# Altium PCB RemoteSensorUnit-v1.0.PcbDoc (part 4 of 5)
Units mm, origin at the board's own origin, x right, y up, seen from the top; angles counter-clockwise.
Board outline 80 x 114 mm, 2 copper layers (Top Layer, Bottom Layer), stack 1.448 mm thick; 163 components, 122 nets, 631 pads, 300 vias.
Unrouted connection lines stored in the file: 147.
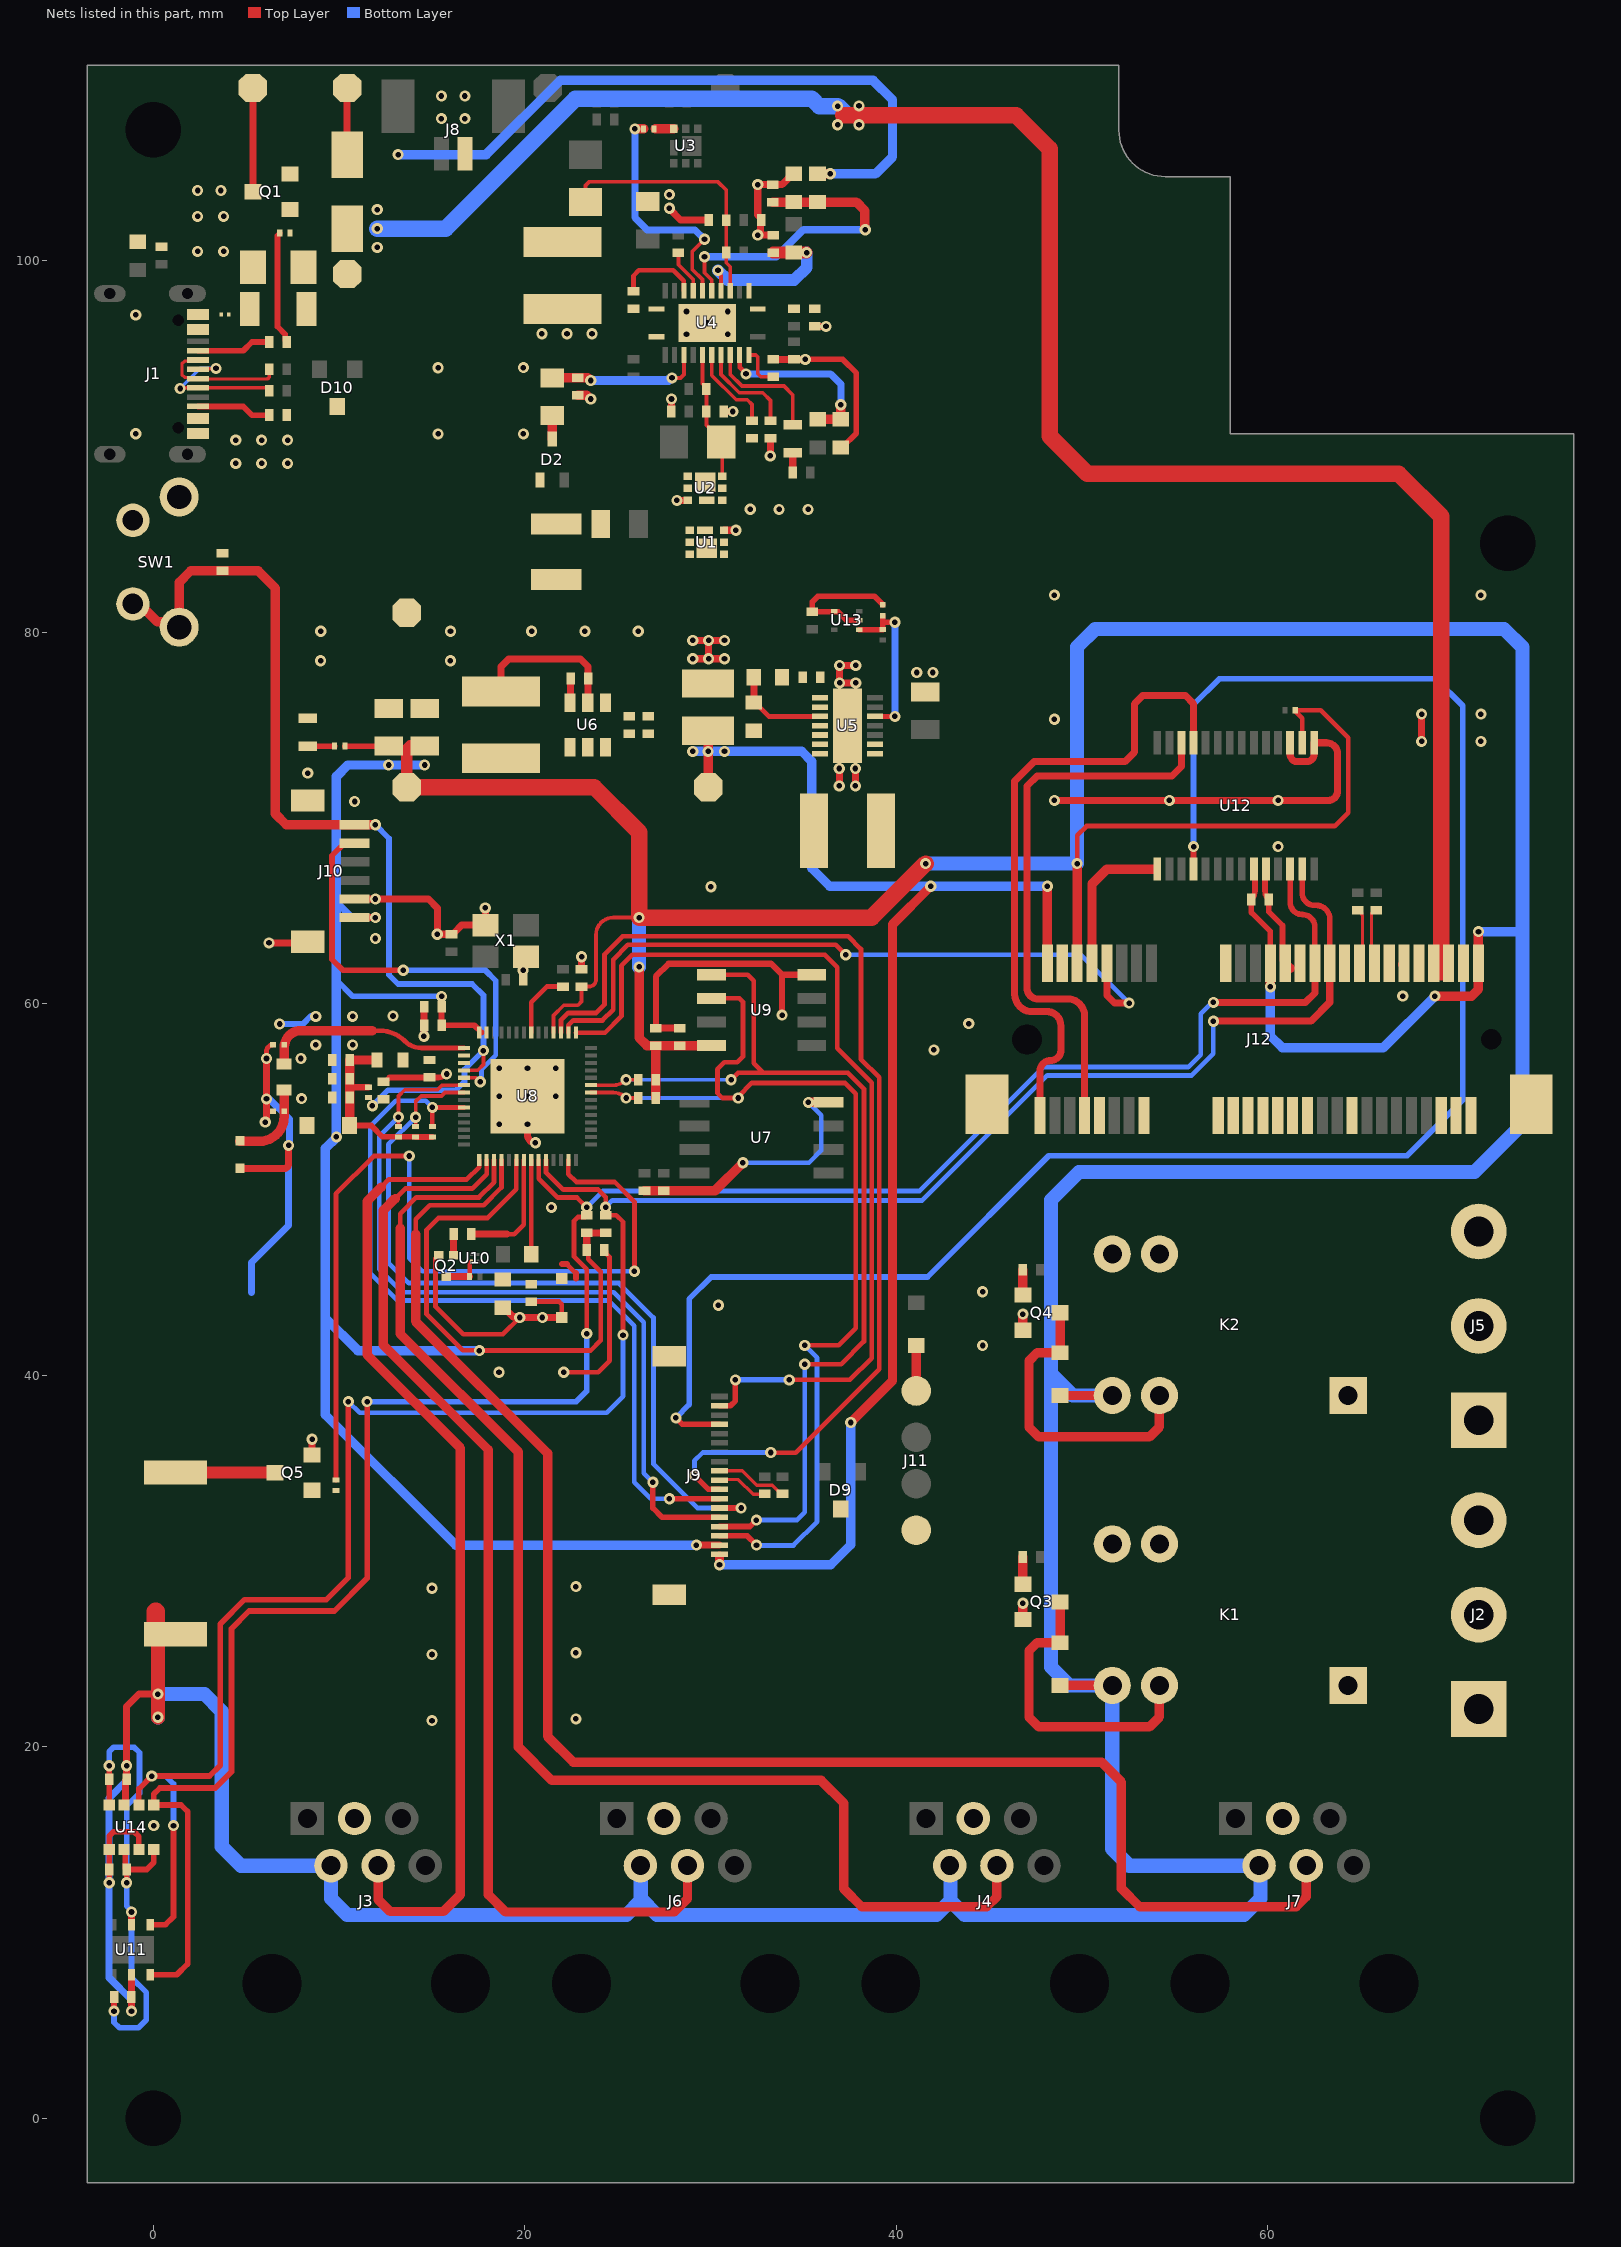
[diagram p2: the nets of this part, all layers, seen from the top]

## Via types
v1: diameter 0.6, hole 0.3, Top Layer to Bottom Layer, 300 vias

## Nets (pads, with @x,y where several pads share a name; then routed paths per layer and width w, separated by ;. In a path a pad name is that pad's centre, name@x,y a point inside that pad or via, vN(x,y) a via of type N, cw(c..) or ccw(c..) an arc to the next point about the centre after c; other vN are vias at no path point) (continued)
BUZZER: (continued)
  Top Layer w0.254: R44.1@9.839,34.355 9.839,49.771 11.868,51.8 v1(13.787,51.8) ; U8.27@22.352,51.59 22.352,50.831 22.779,50.404 24.835,50.404 25.908,49.331 v1(25.908,45.596)
  Bottom Layer w0.254: v1(13.787,51.8) 13.787,46.3 14.491,45.596 v1(25.908,45.596)
CMSRC: R15.1 U1.4 U1.7 U2.4 U2.7
  other v1: 32.139,86.617 33.698,86.613 35.256,86.609
D/C: J9.4 U12.4 | length 101
  Top Layer w0.305: v1(28.137,37.702) 28.487,37.352 J9.4@30.488,37.352 ; U12.4@56.007,67.247 v1(56.007,68.456)
  Bottom Layer w0.305: v1(28.137,37.702) 28.854,38.42 28.854,44.094 30.046,45.286 41.689,45.286 48.216,51.813 67.504,51.813 70.5,54.809 70.5,76.039 69.051,77.488 57.389,77.488 56.007,76.106 v1(56.007,68.456)
DCDC_POK: J12.8 U12.1 | length 8.1
  Top Layer w0.508: J12.8@50.541,62.178 50.541,66.447 51.341,67.247 U12.1@54.004,67.247
EN: C37.2 C38.2 J10.6 R29.1 SW1.2 SW1.3 U8.4 | length 55.4
  Top Layer w0.203: U8.4@16.727,56.415 17.469,56.415 17.78,56.726 v1(17.78,57.475)
  Top Layer w0.508: SW1.2@-1.089,81.522 -0.739,81.522 0.211,80.572 1.097,80.572 SW1.3@1.401,80.267 1.401,82.68 2.024,83.303 C38.2@3.738,83.303 5.646,83.303 6.579,82.369 6.579,70.221 7.164,69.636 v1(11.963,69.636)
  Bottom Layer w0.305: v1(11.8,54.509) 12.641,55.35 16.307,55.35 16.762,55.804 16.762,56.456 v1(17.78,57.475) 17.78,60.456 17.172,61.065 13.185,61.065 12.699,61.551 12.699,68.901 v1(11.963,69.636)
GATE_DRIVER: R16.1 U1.3 U2.3 | length 2.2
  Top Layer w0.381: v1(28.192,87.096) U2.3@28.788,87.096 ; U1.3@30.729,85.489 v1(31.368,85.489) ; v1(33.223,89.487) 33.228,89.492 33.228,90.442 R16.1@33.232,90.447
GND: ANT1.GND C1.1 C3.2 C4.2 C8.2 C10.2 C12.2 C15.1 C16.1 C18.1 C19.1 C20.2 C22.1 C23.1 C24.1 C25.1 C26.1 C27.1 C28.1 C29.1 C30.1 C31.1 C32.1 C33.1 C34.1 C35.1 C36.1 C37.1 C38.1 C39.1 C40.1 C41.1 C42.2 C43.2 C44.2 C45.1 C46.2 C47.1 C48.2 C49.1 C50.1 C51.1 D1.2 D5.2 D6.1 D9.3 D10.3 J1.A1/B12 J1.B1/A12 J3.3 J4.3 J6.3 J7.3 J8.1 J9.MP1 J9.MP2 J10.2 J10.MP1 J10.MP2 J11.4 J12.4 J12.9 J12.15 J12.17 J12.18 J12.19 J12.21 J12.23 J12.25 J12.26 J12.27 J12.28 J12.29 J12.34 J12.35 J12.40 J12.42 J12.44 J12.47 J12.49 J12.50 J12.51 J12.53 J12.54 LED2.2 P6.1 Q2.2 Q3.2 Q4.2 Q5.2 R1.2 R2.2 R5.2 R9.1 R10.1 R18.1 R20.1 R22.1 R24.1 R40.2 R48.1 SW1.1 SW1.4 U4.14 U4.25 U5.2 U5.15 U6.4 U7.4 U8.57 U9.4 U11.2 U12.10 U12.15 U12.17 U13.2 U13.4 U14.1 U14.5 U14.7 X1.2 X1.4 | length 199.2
  Top Layer w0.254: v1(6.1,57.051) 6.1,57.432 cw(c6.452,57.432) C51.1@6.452,57.784 ; Q2.2@15.249,46.362 15.347,46.46 Q2.2@15.372,46.46 15.204,46.291 15.204,43.687 16.689,42.201 18.83,42.201 v1(19.736,43.107) ; C42.2@20.352,43.966 21.847,43.966 21.996,43.817 D6.1@21.996,43.106 ; v1(22.099,40.157) 23.953,40.157 24.57,40.774 24.57,46.361 C39.1@24.357,46.574 ; 22.272,45.977 22.759,45.49
  Top Layer w0.305: U14.1@-2.368,16.866 C47.1@-2.368,18.252 v1(-2.368,18.977) ; v1(-2.108,5.769) C48.2@-2.108,6.531 ; U14.7@-1.568,14.466 -1.498,14.396 -1.498,13.459 C46.2@-1.429,13.389 ; v1(-1.429,12.678) C46.2@-1.429,13.389 ; U14.5@0.032,14.466 0.032,13.768 -0.348,13.389 C46.2@-1.429,13.389 ; R22.1@6.814,101.482 6.814,101.466 6.695,101.347 6.695,96.449 7.112,96.032 7.112,95.7 R1.2@7.188,95.624 ; C37.1@12.403,55.803 12.492,55.803 12.718,56.029 C32.1@14.867,56.029 15.348,56.029 ccw(c15.348,56.666) v1(15.799,56.216) ; C39.1@24.281,46.739 24.357,46.663 C39.1@24.357,46.574 ; R18.1@33.356,104.097 R18.1@33.37,104.111 ; C49.1@34.433,104.681 C49.1@34.496,104.681 ; v1(35.102,94.688) 37.119,94.688 37.854,93.953 37.854,90.712 37.082,89.94 R20.1@37.018,89.94 ; U13.2@38.016,80.636 37.341,80.636 36.871,81.106 C44.2@35.479,81.106 35.479,81.633 35.781,81.935 38.827,81.935 C45.1@39.279,81.483 ; U12.10@59.907,67.247 59.853,67.193 59.853,66.088 ccw(c60.498,66.088) C43.2@60.042,65.632 ; C43.2@60.063,65.612 60.063,64.942 60.794,64.211 60.794,62.326 J12.26@60.941,62.178
  Top Layer w0.33: J10.MP1@8.318,63.336 J10.MP1@8.56,63.093 ; 22.01,45.977 22.272,45.977 ; 22.759,45.217 22.759,45.49 ; C34.1@27.061,58.687 27.061,61.467 27.744,62.15 33.266,62.15 33.858,61.557 ; v1(33.858,59.388) 33.858,61.557 ; U9.4@35.455,61.557 33.858,61.557
  Top Layer w0.381: U11.2@-1.168,10.421 v1(-1.168,11.103) ; ANT1.GND@4.669,51.137 5.105,51.137 5.105,51.13 7.036,51.13 ccw(c7.036,51.384) 7.291,51.384 v1(7.291,52.374) ; v1(6.03,53.624) 6.071,53.666 6.071,53.821 6.1,53.849 v1(6.1,54.876) v1(6.1,57.051) ; v1(6.236,63.274) 8.379,63.274 J10.MP1@8.56,63.093 ; Q5.2@8.553,35.705 v1(8.553,36.554) ; J10.2@10.843,65.636 14.814,65.636 15.296,65.154 v1(15.296,63.739) C40.1@16.063,63.739 16.152,63.739 16.19,63.777 16.19,63.811 16.609,64.23 X1.4@17.88,64.23 v1(17.88,65.154) ; v1(14.577,58.249) 14.581,58.253 14.581,58.834 C27.1@14.584,58.837 C28.1@14.584,59.837 ; R40.2@18.828,43.635 18.891,43.635 19.378,43.149 19.694,43.149 v1(19.736,43.107) ; v1(19.736,43.107) 20.954,43.106 D6.1@21.996,43.106 ; C41.1@19.92,61.293 19.918,61.295 19.918,61.797 v1(19.916,61.799) 19.916,62.366 X1.2@20.08,62.53 ; v1(20.152,53.505) 20.152,52.935 ccw(c20.574,52.935) v1(20.574,52.513) ; C26.1@23.063,61.865 v1(23.063,62.53) ; C34.1@27.061,58.687 C33.1@28.345,58.687 ; v1(27.788,102.822) 27.788,102.797 28.397,102.187 C10.2@29.909,102.187 ; C4.2@27.902,91.88 v1(27.902,92.553) ; v1(29.049,78.57) v1(29.903,78.57) ; v1(29.049,79.561) v1(29.903,79.561) ; C3.2@30.721,91.88 v1(31.21,91.88) ; v1(30.757,78.57) v1(29.903,78.57) ; v1(30.757,79.561) v1(29.903,79.561) ; C12.2@32.717,102.199 32.717,102.287 32.545,102.459 v1(32.545,104.097) R18.1@33.356,104.097 ; C12.2@32.728,102.187 32.69,102.149 32.69,101.583 32.545,101.438 v1(32.545,101.379) R9.1@33.379,101.379 ; R18.1@33.37,104.111 33.862,104.111 C49.1@34.433,104.681 ; C15.1@33.379,94.688 C16.1@34.496,94.688 v1(35.102,94.688) ; R10.1@35.614,96.463 v1(36.22,96.463) ; v1(36.937,71.724) v1(36.937,72.663) ; v1(37.801,71.724) v1(37.801,72.663) ; v1(37.821,77.27) v1(36.957,77.27) v1(36.957,78.21) v1(37.821,78.21) ; v1(48.514,70.945) 63.271,70.945 ccw(c63.271,71.428) 63.754,71.428 63.754,73.468 ccw(c63.175,73.468) 63.175,74.047 U12.15@62.507,74.047 62.507,73.468 cw(c62.067,73.468) 62.067,73.028 61.601,73.028 cw(c61.601,73.422) 61.207,73.422 U12.17@61.207,74.047 ; v1(68.286,74.12) v1(68.286,75.593) ; v1(29.903,78.57) v1(29.903,79.561)
  Top Layer w0.508: C8.2@22.86,92.751 23.33,92.751 23.528,92.553 v1(23.553,92.553) ; C35.1@26.45,49.94 C36.1@27.491,49.94 30.252,49.94 v1(31.75,51.438) ; v1(35.27,54.69) U7.4@36.36,54.69 ; Q3.2@46.823,26.845 v1@46.823,27.721 ; Q4.2@46.823,42.415 v1@46.823,43.291 ; J12.26@60.941,62.178 J12.26@61.207,61.912 ; J12.42@67.273,62.11 J12.42@67.341,62.178
  Bottom Layer w0.254: v1(31.75,51.438) 35.306,51.438 35.966,52.098 35.966,53.994 v1(35.27,54.69)
  Bottom Layer w0.305: v1(-2.368,18.977) -2.368,19.735 -2.134,19.97 -1.025,19.97 -0.737,19.681 -0.737,17.504 -1.429,16.812 v1(-1.429,12.678) -1.429,11.429 -1.168,11.169 v1(-1.168,11.103) -1.168,7.563 -0.369,6.764 -0.369,5.3 -0.8,4.869 -1.815,4.869 -2.108,5.162 v1(-2.108,5.769)
  Bottom Layer w0.33: v1(6.807,58.906) 8.055,58.906 8.487,59.337 v1@8.56,59.337
  Bottom Layer w0.381: 5.294,44.453 5.294,46.064 7.291,48.06 v1(7.291,52.374) ; v1@6.248,54.876 7.332,53.792 v1@7.332,52.374
  other v1: 0.032,15.754 15.011,21.402 22.756,21.498 15.011,24.965 22.756,25.06 46.824,27.721 15.011,28.527 22.756,28.623 18.618,40.157 44.653,41.599 20.955,43.106 46.824,43.292 30.429,43.767 44.653,44.495 21.435,49.035 18.642,53.505 7.987,54.892 18.642,55.015 20.152,55.015 21.662,55.015 18.642,56.525 20.152,56.525 21.662,56.525 7.95,57.051 42.032,57.516 8.75,57.784 10.735,57.784 43.909,58.931 8.75,59.316 10.735,59.316 12.909,59.339 67.273,60.406 11.963,63.51 11.963,65.636 30.023,66.297 60.557,68.456 10.843,70.886 54.707,70.945 60.557,70.945 8.318,72.41 71.476,74.12 48.514,75.314 71.476,75.593 41.108,77.829 41.972,77.829 9.014,78.462 16.002,78.462 9.017,80.051 16.005,80.051 20.371,80.051 23.241,80.051 26.111,80.051 48.514,81.994 71.476,81.994 4.441,89.09 5.838,89.09 7.235,89.09 4.441,90.341 5.838,90.341 7.235,90.341 -0.94,90.681 15.342,90.674 19.932,90.677 15.342,94.237 19.932,94.24 28.71,96.043 30.93,96.043 29.82,96.653 -0.94,97.081 28.71,97.263 30.93,97.263 2.393,100.497 3.79,100.497 2.393,102.382 3.79,102.382 27.788,103.559 2.393,103.779 3.644,103.779 15.519,107.648 16.779,107.648 15.519,108.867 16.779,108.867
GSM/W5500/LORA_RST: J12.7 U12.26 | length 30.2
  Top Layer w0.381: J12.7@50.141,53.978 50.141,59.353 ccw(c49.241,59.353) 50.103,59.613 ccw(c49.241,59.353) 49.501,60.215 ccw(c49.241,59.353) 49.241,60.253 47.644,60.253 cw(c47.644,60.856) 47.041,60.856 47.041,71.712 47.595,72.266 54.849,72.266 55.357,72.774 U12.26@55.357,74.047
GSM/W5500_PWR_EN: J12.1 U12.25 | length 35.7
  Top Layer w0.381: J12.1@47.741,53.978 47.741,56.372 cw(c48.303,56.372) 48.303,56.934 ccw(c48.303,57.496) 48.865,57.496 48.865,58.824 ccw(c48.114,58.824) 48.114,59.575 47.312,59.575 cw(c47.312,60.507) 46.379,60.507 46.379,71.983 47.424,73.028 52.321,73.028 52.832,73.539 52.832,76.144 53.272,76.584 55.567,76.584 56.007,76.144 U12.25@56.007,74.047
I2C.SCL: J12.30 R32.1 U8.23 U11.6 U12.12 U14.4 | length 123
  Top Layer w0.254: U8.23@20.752,51.59 20.752,50.587 21.772,49.566 22.816,49.566 v1(23.341,49.041) R32.1@23.341,48.606 23.248,48.512 22.858,48.512 22.658,48.313 22.658,46.381 23.341,45.698 v1(23.341,42.243)
  Top Layer w0.305: U11.6@-0.168,7.721 1.269,7.721 1.854,8.306 1.854,16.51 1.499,16.866 U14.4@0.032,16.866 0.032,17.453 0.36,17.781 3.339,17.781 4.212,18.654 4.212,26.354 5.166,27.308 9.754,27.308 11.516,29.07 v1(11.516,38.578) ; U12.12@61.207,67.247 61.207,65.461 ccw(c61.87,65.461) 61.87,64.799 cw(c61.87,64.127) 62.541,64.127 J12.30@62.541,62.178
  Top Layer w0.381: v1(57.075,60.074) 62.033,60.074 62.541,60.582 J12.30@62.541,62.178
  Bottom Layer w0.254: v1(23.341,49.041) 24.215,49.914 41.252,49.914 47.928,56.59 55.721,56.59 56.395,57.264 56.395,59.45 57.02,60.074 v1(57.075,60.074)
  Bottom Layer w0.305: v1(11.516,38.578) 22.776,38.578 23.341,39.143 v1(23.341,42.243)
I2C.SDA: J12.32 R33.1 U8.24 U11.1 U12.13 U14.3 | length 124.6
  Top Layer w0.254: U8.24@21.152,51.59 21.152,50.91 22.07,49.992 23.959,49.992 24.359,49.593 v1(24.359,49.041) R33.1@24.359,48.606 24.936,48.606 25.294,48.248 v1(25.294,42.159)
  Top Layer w0.305: U14.3@-0.768,16.866 -0.768,17.729 v1(-0.076,18.421) 3.034,18.421 3.61,18.997 3.61,26.606 4.924,27.92 9.324,27.92 10.508,29.104 v1(10.508,38.578) ; U11.1@-0.168,10.421 0.667,10.421 1.095,10.849 v1(1.095,15.754) ; U12.13@61.857,67.247 61.857,65.967 ccw(c62.53,65.967) 62.53,65.294 62.612,65.294 cw(c62.612,64.565) 63.341,64.565 J12.32@63.341,62.178
  Top Layer w0.381: v1(57.075,59.058) 62.325,59.058 63.341,60.074 J12.32@63.341,62.178
  Bottom Layer w0.254: v1(10.508,38.578) 11.113,37.973 24.407,37.973 25.294,38.861 v1(25.294,42.159) ; v1(24.359,49.041) 24.724,49.406 41.399,49.406 48.13,56.137 55.904,56.137 57.075,57.308 v1(57.075,59.058)
  Bottom Layer w0.305: v1(-0.076,18.421) 0.674,18.421 1.095,18 v1(1.095,15.754)
IN_1: J2.2 K1.1
IN_2: J5.2 K2.1
IO0: J10.5 U8.5 | length 23.1
  Top Layer w0.203: U8.5@16.727,56.015 17.396,56.015 v1(17.61,55.801)
  Top Layer w0.305: J10.5@10.843,68.636 10.293,68.636 9.628,67.972 9.628,62.387 10.214,61.801 v1(13.462,61.801)
  Bottom Layer w0.254: v1(17.61,55.801) 17.676,55.867 17.676,56.469 18.437,57.229 18.437,58.296
  Bottom Layer w0.305: v1(13.462,61.801) 17.878,61.801 18.437,61.243 18.437,58.296
IO1: J3.4 U8.15 | length 53.5
  Top Layer w0.254: 12.27,50.118 12.692,50.54 16.885,50.54 17.552,51.207 U8.15@17.552,51.59
  Top Layer w0.508: J3.4@12.109,13.594 12.109,11.77 12.751,11.128 15.626,11.128 16.538,12.04 16.538,36.075 11.516,41.097 11.516,49.364 12.27,50.118
IO2: J6.4 U8.16 | length 59.5
  Top Layer w0.254: 13.021,49.505 13.563,50.047 17.168,50.047 17.952,50.831 U8.16@17.952,51.59
  Top Layer w0.508: 13.021,49.505 12.39,48.874 12.39,41.632 18.034,35.988 18.034,12.04 18.971,11.103 28.05,11.103 28.765,11.818 J6.4@28.765,13.594
IO3: J4.4 U8.17 | length 72.2
  Top Layer w0.254: 13.294,47.912 13.294,48.688 14.174,49.568 17.536,49.568 18.352,50.383 U8.17@18.352,51.59
  Top Layer w0.508: 13.294,47.912 13.294,42.235 19.66,35.87 19.66,19.985 21.455,18.19 35.957,18.19 37.186,16.961 37.186,12.342 38.146,11.382 44.876,11.382 45.421,11.928 J4.4@45.421,13.594
IO4: J7.4 U8.18 | length 87.5
  Top Layer w0.254: 14.129,47.595 14.129,48.391 14.887,49.149 17.795,49.149 18.752,50.107 U8.18@18.752,51.59
  Top Layer w0.508: 14.129,47.595 14.129,42.897 21.23,35.797 21.23,20.553 22.613,19.17 51.051,19.17 52.123,18.098 52.123,12.366 53.107,11.382 61.532,11.382 62.078,11.928 J7.4@62.078,13.594
ISET: R7.1 R10.2 U4.13
LED_DATA: J9.11 U8.45 | length 58
  Top Layer w0.254: U8.45@21.952,58.44 21.952,59.118 22.338,59.503 23.839,59.503 24.297,59.961 24.297,62.66 25.27,63.633 37.407,63.633 38.1,62.94 38.1,57.018 39.087,56.032 39.087,40.326 34.591,35.83 33.258,35.83 v1(33.249,35.839)
  Top Layer w0.305: v1(29.138,34.602) 29.888,33.852 J9.11@30.488,33.852
  Bottom Layer w0.254: v1(29.138,34.602) 29.138,35.387 29.591,35.839 v1(33.249,35.839)
LORA_IO0: J12.10 U8.44 | length 38.4
  Top Layer w0.254: U8.44@22.352,58.44 22.352,58.841 22.612,59.1 24.185,59.1 24.763,59.678 24.763,62.379 25.557,63.173 36.748,63.173 v1(37.287,62.633)
  Top Layer w0.381: J12.10@51.341,62.178 51.341,60.445 51.758,60.029 v1(52.541,60.029)
  Bottom Layer w0.254: v1(37.287,62.633) 49.937,62.633 v1(52.541,60.029)
NC_1: J2.1 K1.3
NC_2: J5.1 K2.3
NetANT1_ANT#: ANT1.ANT# C50.2 L5.1 | length 4.6
  Top Layer w0.508: ANT1.ANT#@4.67,52.593 4.942,52.593 5.722,52.593 ccw(c5.722,53.922) 7.052,53.922 L5.1@7.052,55.342
NetC2_2: C2.2 C3.1 R8.1 U2.1 U2.2 U2.5 U2.6 U2.8 U4.6 | length 7
  Top Layer w0.203: U4.6@29.57,94.928 29.57,93.394 29.782,93.183 C2.2@29.782,93.103 ; C2.2@29.782,93.094 C3.1@29.782,91.88 29.782,91.156 30.633,90.304 U2.6@30.633,88.396
NetC6_2: C6.2 R47.1
NetC9_1: C9.1 U4.21 | length 4.4
  Top Layer w0.254: C9.1@25.858,98.343 25.858,99.188 26.148,99.479 27.991,99.479 28.557,98.913 28.557,98.391 U4.21@28.57,98.378
NetC9_2: C9.2 L1.1 U4.1 U4.24
  other v1: 20.927,96.066 22.276,96.066 23.625,96.066
NetC10_1: C10.1 C11.2 L1.2 R17.1 U4.16 | length 14.2
  Top Layer w0.203: R17.1@23.273,103.157 23.273,104.048 23.469,104.244 30.406,104.244 30.848,103.801 30.848,99.89 31.07,99.668 U4.16@31.07,98.378
NetC15_2: C15.2 U4.11 | length 2.3
  Top Layer w0.203: U4.11@32.07,94.928 32.431,94.928 32.55,94.809 32.55,93.908 32.71,93.749 C15.2@33.379,93.749
NetC17_2: C17.2 U4.20 | length 2.4
  Top Layer w0.203: C17.2@28.27,100.435 28.281,100.424 28.281,99.783 29.07,98.994 U4.20@29.07,98.378
NetC20_1: C20.1 U5.1
NetC21_1: C21.1 L3.1 U6.5 | length 8.3
  Top Layer w0.381: L3.1@18.724,76.81 18.724,78.141 19.138,78.555 23.001,78.555 23.41,78.146 C21.1@23.41,77.499 23.404,77.493 23.404,76.216 U6.5@23.398,76.21
NetC21_2: C21.2 U6.6 | length 1.3
  Top Layer w0.381: U6.6@22.448,76.21 22.459,76.221 22.459,77.488 C21.2@22.471,77.499
NetC32_2: C32.2 L4.2 U8.2 U8.3
NetC49_2: C49.2 R14.1 R18.2 U4.18 | length 17.4
  Top Layer w0.203: v1(29.68,100.21) 29.68,99.35 30.066,98.964 30.066,98.382 U4.18@30.07,98.378
  Top Layer w0.508: R18.2@33.356,103.157 33.359,103.155 34.496,103.155 35.761,103.155 R14.1@35.763,103.152 37.855,103.152 38.315,102.692 38.315,101.684 v1(38.333,101.667)
  Bottom Layer w0.381: v1(29.68,100.21) 33.544,100.21 35,101.667 v1(38.333,101.667)
NetC51_2: C51.2 L5.2 U8.1 | length 11.4
  Top Layer w0.254: 11.8,58.55 12.189,58.55 cw(c12.189,56.639) 13.541,57.99 ccw(c14.447,58.897) 14.447,57.615 U8.1@16.727,57.615
  Top Layer w0.508: L5.2@7.052,56.774 C51.2@7.052,57.784 ; C51.2@7.063,57.666 cw(c7.947,57.666) 7.947,58.55 8.153,58.55 11.8,58.55
NetD1_1: D1.1 F1.1 J1.A4/B9 J1.B4/A9
NetD2_3: D2.3 R13.1 | length 1.3
  Top Layer w0.508: D2.3@21.476,90.394 R13.1@21.476,91.659
NetD4_2: D4.2 J11.1 | length 2.4
  Top Layer w0.508: J11.1@41.076,39.156 D4.2@41.076,41.602
NetD7_2: D7.2 K1.4 Q3.3 | length 16.7
  Top Layer w0.508: D7.2@48.823,25.599 47.586,25.599 47.149,25.163 47.149,21.591 47.673,21.067 53.632,21.067 54.173,21.608 K1.4@54.173,23.299 ; D7.2@48.823,25.638 Q3.3@48.823,27.795
NetD8_2: D8.2 K2.4 Q4.3 | length 16.7
  Top Layer w0.508: Q4.3@48.823,43.365 D8.2@48.823,41.208 47.586,41.208 47.149,40.771 47.149,37.199 47.673,36.675 53.632,36.675 54.173,37.217 K2.4@54.173,38.908
NetF1_2: F1.2 FB1.1
NetJ1_A5: J1.A5 R1.1 | length 4
  Top Layer w0.305: J1.A5@2.413,95.153 4.846,95.153 5.316,95.624 R1.1@6.248,95.624
NetJ1_A6: J1.A6 J1.B6 R3.1 | length 8.4
  Top Layer w0.178: v1@1.334,93.12 v1(1.448,93.12) 1.481,93.153 J1.B6@2.413,93.153 6.193,93.153 6.254,93.092 R3.1@6.254,93.003 ; J1.A6@2.413,94.153 2.437,94.178 3.359,94.178 v1(3.384,94.202)
  Bottom Layer w0.178: v1(1.448,93.12) 2.529,94.202 v1(3.384,94.202)
NetJ1_A7: J1.A7 J1.B7 R4.1 | length 7
  Top Layer w0.178: J1.B7@2.413,94.653 2.357,94.597 1.698,94.597 1.55,94.449 1.55,93.866 1.702,93.714 2.352,93.714 J1.A7@2.413,93.653 2.431,93.635 5.819,93.635 6.121,93.635 ccw(c6.121,93.763) 6.248,93.763 6.248,94.064 R4.1@6.248,94.153 R4.1@6.121,94.026
NetJ1_B5: J1.B5 R2.1 | length 4
  Top Layer w0.305: J1.B5@2.413,92.153 4.846,92.153 5.316,91.683 R2.1@6.248,91.683
NetJ9_9: J9.9 R30.1 | length 4
  Top Layer w0.178: J9.9@30.488,34.852 J9.9@30.518,34.823 ; J9.9@30.499,34.863 31.706,34.863 32.494,34.076 33.325,34.076 33.795,33.606 R30.1@33.884,33.606 ; R30.1@33.998,33.606 R30.1@34.087,33.606
NetJ9_10: J9.10 R31.1 | length 3
  Top Layer w0.178: J9.10@30.508,34.333 J9.10@30.488,34.352 30.519,34.383 31.505,34.383 32.295,33.593 R31.1@33.113,33.593
NetJ12_36: J12.36 R45.1 | length 3.1
  Top Layer w0.178: R45.1@64.842,65.027 64.931,65.027 65.071,64.888 65.071,64.799 65.1,64.769 65.1,62.337 J12.36@64.941,62.178
NetJ12_38: J12.38 R46.1 | length 3.1
  Top Layer w0.178: J12.38@65.741,62.178 65.589,62.331 65.589,64.863 65.753,65.027 R46.1@65.842,65.027
NetL2_1: L2.1 U5.8 U5.9
NetL2_2: L2.2 U5.6 U5.7
NetLED1_1: LED1.1 R21.2 | length 1.1
  Top Layer w0.381: R21.2@34.433,88.596 LED1.1@34.433,89.667
NetLED1_2: LED1.2 U4.9 | length 6.5
  Top Layer w0.203: U4.9@31.07,94.928 31.07,93.87 31.693,93.247 33.962,93.247 34.433,92.776 LED1.2@34.433,91.167
NetLED2_1: LED2.1 R25.1 | length 1.4
  Top Layer w0.305: LED2.1@8.318,73.867 R25.1@9.768,73.867
NetLS1_2: LS1.2 Q5.3 | length 5.4
  Top Layer w0.635: LS1.2@1.198,34.755 Q5.3@6.553,34.755
NetQ2_1: Q2.1 R39.2 | length 1.1
  Top Layer w0.381: Q2.1@16.172,46.46 R39.2@16.172,47.595
NetQ2_3: Q2.3 R38.2 U10.1 | length 2.1
  Top Layer w0.254: R38.2@17.035,45.31 17.035,46.028 U10.1@17.12,46.113
  Top Layer w0.381: Q2.3@15.772,45.31 R38.2@17.035,45.31
NetQ3_1: Q3.1 R41.2 | length 1.5
  Top Layer w0.508: Q3.1@46.823,28.745 R41.2@46.823,30.212
NetQ4_1: Q4.1 R42.2 | length 1.4
  Top Layer w0.508: Q4.1@46.823,44.315 R42.2@46.823,45.682
NetQ5_1: Q5.1 R44.2
NetR12_1: R12.1 U3.3 | length 1
  Top Layer w0.508: R12.1@27.039,107.097 U3.3@28.027,107.097
NetR12_2: R12.2 U4.19 | length 12.7
  Top Layer w0.203: U4.19@29.57,98.378 29.568,98.38 29.568,98.989 29.025,99.532 29.025,100.495 v1(29.68,101.15)
  Top Layer w0.508: v1(25.933,107.097) R12.2@26.399,107.097
  Bottom Layer w0.381: v1(25.933,107.097) 25.933,102.314 26.594,101.654 29.176,101.654 v1(29.68,101.15)
NetR15_2: R15.2 U4.7 | length 4.8
  Top Layer w0.203: U4.7@30.07,94.928 30.07,93.827 31.389,92.509 31.982,92.509 32.232,92.258 R15.2@32.232,91.386
NetR16_2: R16.2 U4.8 | length 5.4
  Top Layer w0.203: U4.8@30.57,94.928 30.57,93.868 31.548,92.89 32.82,92.89 33.232,92.478 R16.2@33.232,91.386
NetR19_1: R19.1 R20.2 U4.10 | length 9.6
  Top Layer w0.254: U4.10@31.57,94.928 31.57,94.253 v1(31.915,93.908)
  Top Layer w0.508: R19.1@35.775,91.464 R20.2@37.018,91.464 v1(37.018,92.246)
  Bottom Layer w0.381: v1(31.915,93.908) 36.473,93.908 37.018,93.363 v1(37.018,92.246)
NetR23_1: R23.1 R24.2 U5.3 | length 5.2
  Top Layer w0.203: R23.1@32.334,76.22 R23.1@32.398,76.22
  Top Layer w0.254: R23.1@32.398,76.22 33.151,75.467 U5.3@35.904,75.467
  Top Layer w0.381: R23.1@32.334,76.22 R24.2@32.334,77.575
NetR26_1: R26.1 U8.49 | length 3.7
  Top Layer w0.254: U8.49@20.352,58.44 20.352,60.079 21.198,60.925 R26.1@22.062,60.925
NO_1: J2.3 K1.2
NO_2: J5.3 K2.2
OLED/ENC_SCL: J9.16 R28.1 U8.36 U9.6 | length 55.9
  Top Layer w0.203: U8.36@23.577,55.215 24.758,55.215 cw(c24.758,54.221) v1(25.46,54.924) R28.1@26.121,54.924
  Top Layer w0.254: U9.6@30.055,60.287 31.561,60.287 31.75,60.099 31.75,57.146 31.447,56.843 30.753,56.843 30.377,56.467 30.377,55.193 30.646,54.924 v1(31.496,54.924) ; v1@31.496,54.994 32.235,55.733 37.238,55.733 37.823,55.149 37.823,42.522 36.906,41.605 v1(35.077,41.605)
  Top Layer w0.305: J9.16@30.488,31.352 31.98,31.352 v1@32.473,30.86
  Bottom Layer w0.203: v1(25.46,54.924) v1(31.496,54.924)
  Bottom Layer w0.254: v1(32.48,30.852) 32.497,30.836 34.468,30.836 35.738,32.106 35.738,40.945 v1(35.077,41.605)
OLED/ENC_SDA: J9.15 R27.1 U8.37 U9.5 | length 53.7
  Top Layer w0.203: U8.37@23.577,55.615 24.763,55.615 ccw(c24.763,56.601) v1(25.46,55.904) R27.1@26.121,55.904
  Top Layer w0.254: U9.5@30.055,61.557 32.01,61.557 32.331,61.237 32.331,56.787 32.841,56.278 ; v1(31.115,55.904) 31.489,56.278 32.841,56.278 ; v1(35.077,40.589) 37.034,40.589 38.262,41.817 38.262,55.417 37.401,56.278 32.841,56.278
  Top Layer w0.305: J9.15@30.488,31.852 32.123,31.852 v1(32.473,32.202)
  Bottom Layer w0.203: v1(25.46,55.904) v1(31.115,55.904)
  Bottom Layer w0.254: v1(32.473,32.202) 34.658,32.202 35.077,32.622 v1(35.077,40.589)